# Altium PCB iMX6 Rex_V1I1_PCB.PcbDoc (part 7 of 8)
Units mm, origin at the board's own origin, x right, y up, seen from the top; angles counter-clockwise.
Board outline 70 x 40 mm, 12 copper layers (L1, L2, L3, L4, L5 (PWR), L6 (PWR), L7 (PWR), L8 (PWR), L9, L10, L11, L12), stack 1.566 mm thick; 473 components, 409 nets, 2294 pads, 1880 vias.
Unrouted connection lines stored in the file: 7.
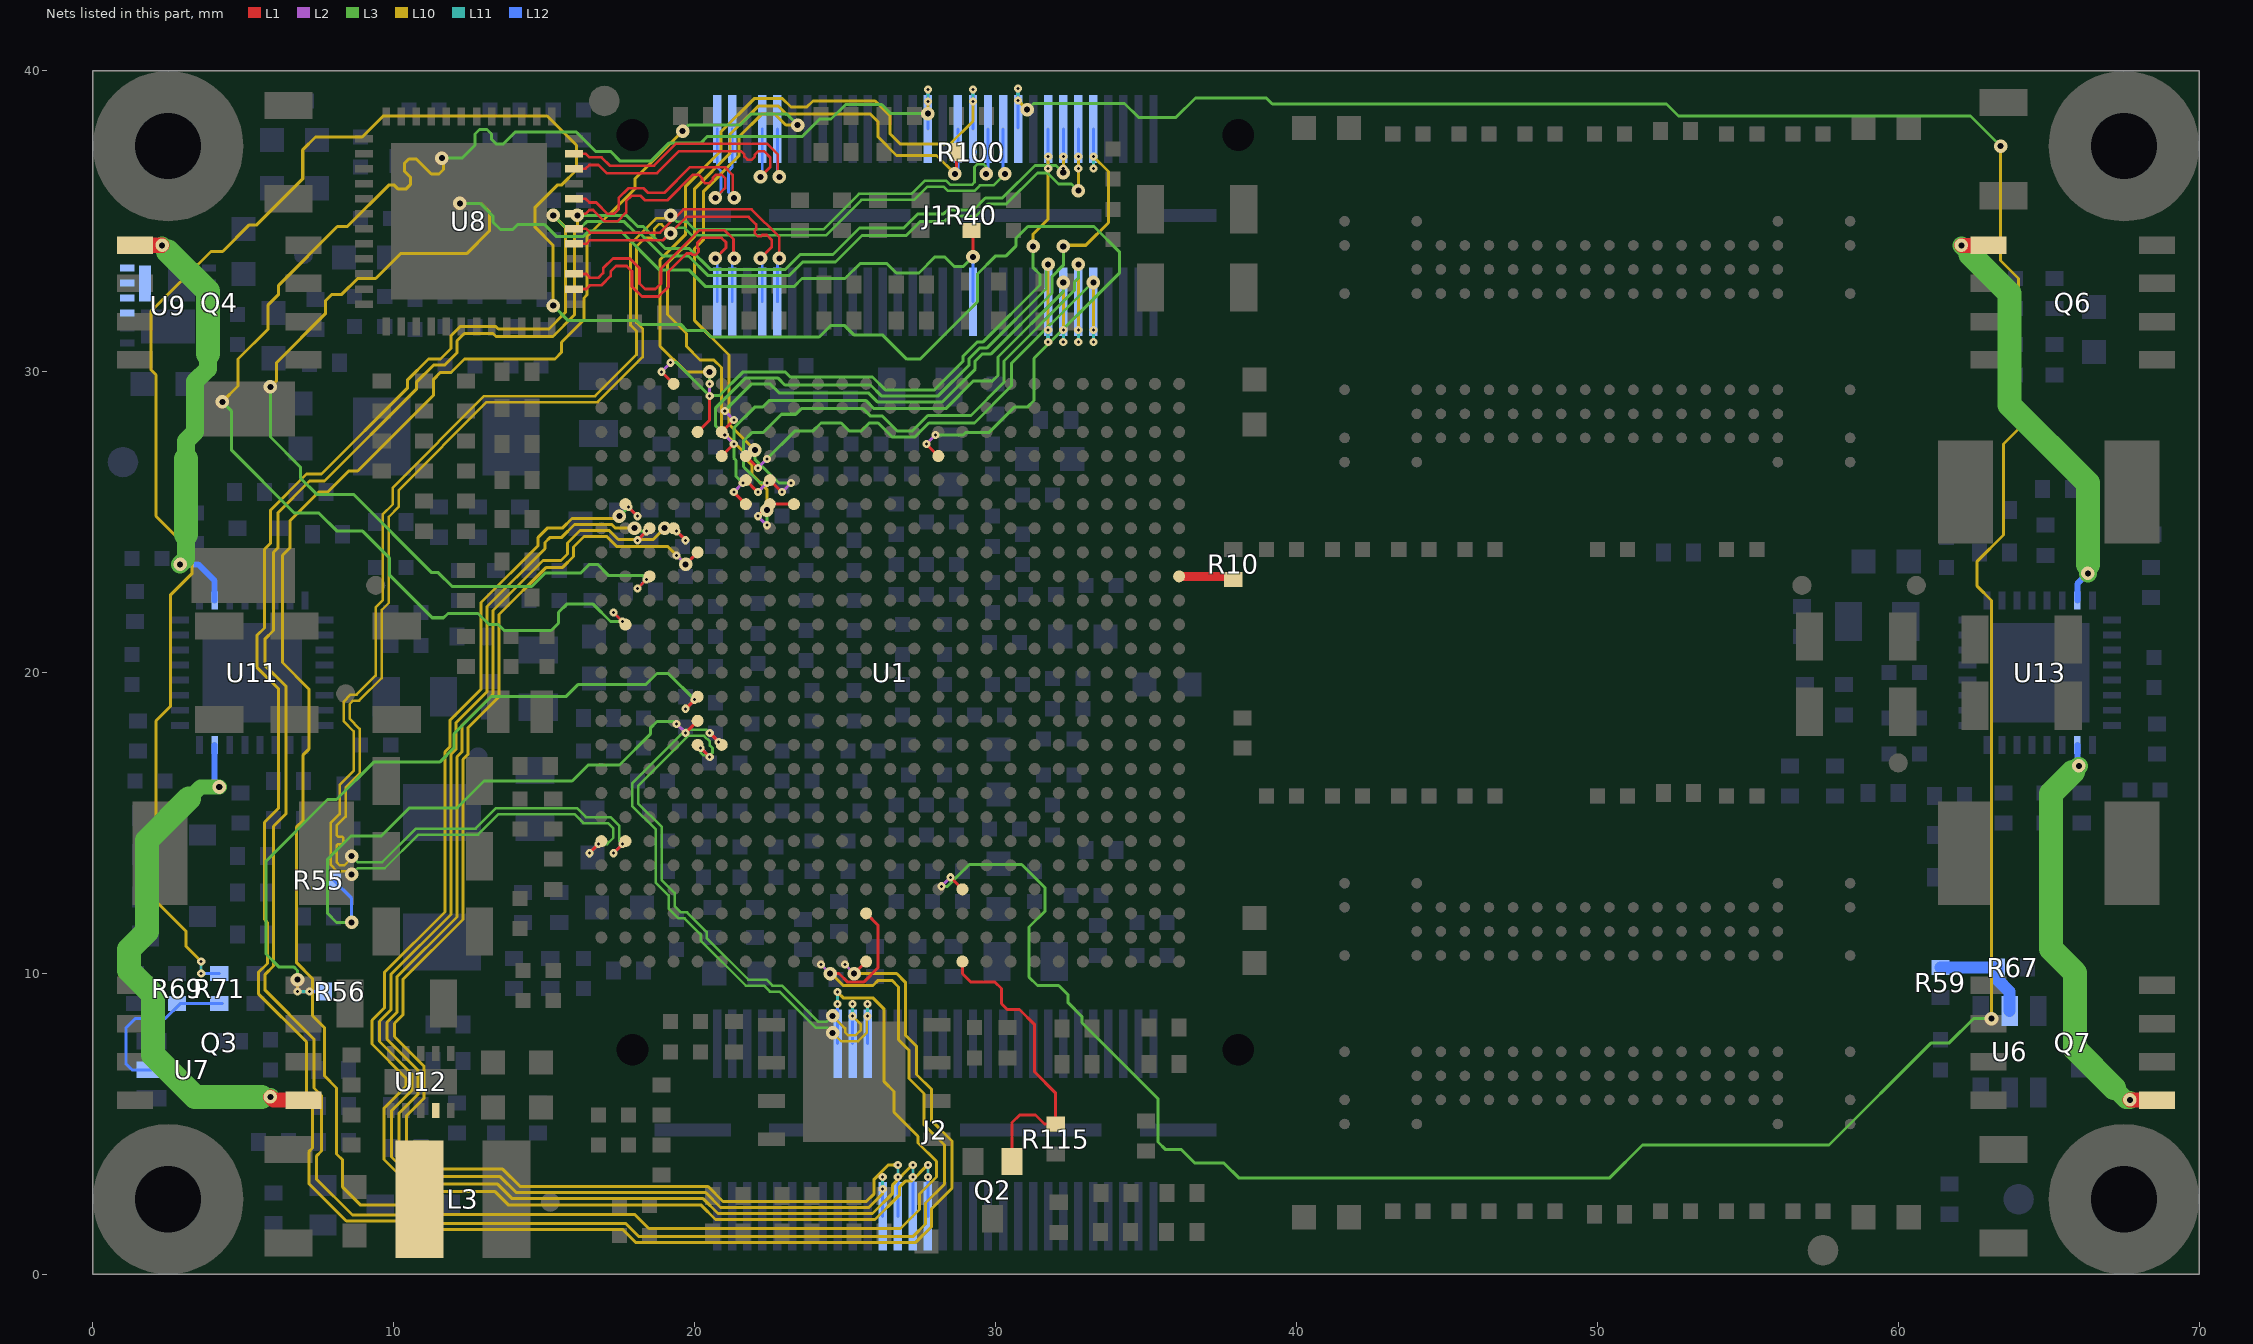
[diagram p17: the nets of this part, all layers, seen from the top]

## Via types
v1: diameter 0.45, hole 0.2, L1 to L12, tented both sides, 761 vias
v2: diameter 0.27, hole 0.1, L1 to L2, 305 vias
v3: diameter 0.27, hole 0.1, L2 to L3, 290 vias
v4: diameter 0.45, hole 0.2, L3 to L10, 196 vias
v5: diameter 0.27, hole 0.1, L11 to L12, 185 vias
v6: diameter 0.27, hole 0.1, L10 to L11, 142 vias
v7: diameter 0.45, hole 0.2, L3 to L10, tented both sides, 1 vias

## Nets (pads, with @x,y where several pads share a name; then routed paths per layer and width w, separated by ;. In a path a pad name is that pad's centre, name@x,y a point inside that pad or via, vN(x,y) a via of type N, cw(c..) or ccw(c..) an arc to the next point about the centre after c; other vN are vias at no path point) (continued)
SD3_DATA3: J1.32 U1.B15 | length 53.4
  L1 w0.1: v2(17.3,22) U1.B15@17.7,21.6
  L2 w0.1: v2(17.3,22) v3(17.6,21.7)
  L3 w0.1: v4(4.3,29) 4.6,28.7 4.6,27.404 6.704,25.3 7.517,25.3 8.117,24.7 8.969,24.7 9.85,23.819 9.85,23.25 11.275,21.825 11.655,21.825 11.8,21.97 12.8,21.97 13.17,21.6 13.47,21.6 13.67,21.4 15.23,21.4 15.475,21.645 15.475,22.005 15.745,22.275 16.628,22.275 17.203,21.7 v3(17.6,21.7) ; v4(11.6,37.1) 12.27,37.1 12.7,37.53 12.7,37.9 12.85,38.05 13.1,38.05 13.25,37.9 13.25,37.725 13.4,37.575 13.645,37.575 14.045,37.975 16.058,37.975 16.708,37.325 17.2,37.325 17.525,37 18.54,37 19.14,37.6 20.196,37.6 20.2,37.596 20.429,37.825 23.58,37.825 24.155,38.4 24.534,38.4 25.019,38.885 26.213,38.885 26.516,38.583 v4(27.75,38.583)
  L10 w0.1: v4(4.3,29) 4.825,29.525 4.825,30.425 5.825,31.425 5.825,32.225 6.175,32.575 6.175,32.875 8.125,34.825 8.455,34.825 9.83,36.2 10.02,36.2 10.15,36.07 10.4,36.07 10.55,36.22 10.55,36.47 10.35,36.67 10.35,36.92 10.5,37.07 10.75,37.07 11.25,36.57 11.5,36.57 11.65,36.72 11.65,37.05 v4(11.6,37.1) ; v4(27.75,38.583) v6(27.75,38.982)
  L11 w0.1: v6(27.75,38.982) v5(27.75,39.383)
  L12 w0.1: J1.32@27.75,38.07 v5(27.75,39.383)
SD3_WP: J1.25 R40.1 U1.C17 | length 51.6
  L1 w0.1: v2(18.1,22.8) U1.C17@18.5,23.2 ; R40.1@29.2,34.7 29.25,34.65 v1(29.25,33.82)
  L2 w0.1: v2(18.1,22.8) v3(18.4,23.1)
  L3 w0.1: v4(5.9,29.5) 5.9,27.83 6.9,26.83 6.9,26.465 7.44,25.925 8.662,25.925 11.262,23.325 11.48,23.325 11.94,22.865 14.583,22.865 15.033,23.315 16.218,23.315 16.503,23.6 16.77,23.6 17.145,23.225 18.275,23.225 v3(18.4,23.1) ; v4(12.2,35.6) 12.87,35.6 13.3,35.17 13.3,34.97 13.545,34.725 13.955,34.725 14.13,34.9 15,34.9 15.4,34.5 16.304,34.5 16.479,34.675 17.544,34.675 18.844,33.375 19.821,33.375 20.366,32.83 23.3,32.83 23.57,33.1 25,33.1 25.5,33.6 26.385,33.6 26.7,33.285 27.455,33.285 27.99,33.82 28.303,33.82 28.623,33.5 28.93,33.5 v1(29.25,33.82)
  L10 w0.1: v4(5.9,29.5) 6.1,29.7 6.1,30.3 7.725,31.925 7.725,32.355 7.945,32.575 8.275,32.575 8.8,33.1 9.4,33.1 10.225,33.925 12.425,33.925 13.175,34.675 13.175,35.325 12.9,35.6 v4(12.2,35.6)
  L12 w0.1: J1.25@29.25,32.33 v1(29.25,33.82)
SENSE_1V5: R59.1 R67.2 U6.5 | length 3.5
  L12 w0.4: R59.1@61.4,10.2 62.4,10.2 R67.2@63.3,10.2 63.3,9.8 63.7,9.4 U6.5@63.7,8.75
SW_3V0_SNVS: L3.1 U12.9
SW_EP: U9.3 U9.4 U9.5 U9.6 U9.14
TAMPER: R55.1 U1.E11 | length 19
  L1 w0.1: v2(19.7,18) U1.E11@20.1,18.4
  L2 w0.1: v3(19.4,18.3) v2(19.7,18)
  L3 w0.1: v1(8.6,11.7) 8.1,11.7 7.8,12 7.8,13.8 8.575,14.575 9.588,14.575 10.513,15.5 12.1,15.5 13,16.4 15.93,16.4 16.462,16.931 17.5,16.931 18.525,17.956 18.525,18.155 18.745,18.375 19.325,18.375 v3(19.4,18.3)
  L12 w0.1: R55.1@8,13.1 8.6,12.5 v1(8.6,11.7)
TEST_MODE: R56.2 U1.E12 | length 24.4
  L1 w0.1: v2(19.7,18.8) U1.E12@20.1,19.2
  L2 w0.1: v2(19.7,18.8) v3(20,19.1)
  L3 w0.1: v4(6.8,9.8) 6.8,10.1 6.675,10.225 6.175,10.225 5.75,10.65 5.75,13.737 7.8,15.787 8.1,15.787 9.338,17.025 11.525,17.025 12,17.5 12,17.966 13.234,19.2 15.717,19.2 16.117,19.6 18.37,19.6 18.745,19.975 19.125,19.975 v3(20,19.1)
  L10 w0.1: v6(6.8,9.4) v4(6.8,9.8)
  L11 w0.1: v6(6.8,9.4) v5(7.2,9.4)
  L12 w0.1: v5(7.2,9.4) R56.2@7.7,9.4
TRD0_N: J1.57 U8.3 | length 9.8
  L1 w0.09: U8.3@15.99,33.25 16.4,33.25 16.525,33.125 16.8,33.125 16.96,33.285 16.96,33.441 17.286,33.767 17.844,33.767 18.17,33.441 18.17,32.937 ; 18.17,32.93 18.35,32.75 18.7,32.75 18.88,32.93 18.88,33.434 20.146,34.7 21,34.7 21.292,34.408 21.292,33.787 v1(21.312,33.767)
  L12 w0.09: J1.57@21.25,32.33 21.25,33.705 v1(21.312,33.767)
TRD0_P: J1.59 U8.2 | length 9.8
  L1 w0.09: U8.2@15.99,32.75 16.4,32.75 16.525,32.875 16.904,32.875 17.21,33.181 17.21,33.337 17.39,33.517 17.74,33.517 17.92,33.337 17.92,32.826 18.246,32.5 18.804,32.5 19.13,32.826 19.13,33.33 19.73,33.93 19.887,33.93 19.93,33.887 20.03,33.887 20.13,33.987 20.13,34.087 20.087,34.13 20.087,34.287 20.25,34.45 20.896,34.45 21.043,34.304 21.043,34.122 v1(20.687,33.767)
  L12 w0.09: v1(20.687,33.767) 20.75,33.705 J1.59@20.75,32.33
TRD1_N: J1.51 U8.6 | length 9.8
  L1 w0.09: U8.6@15.99,34.75 16.4,34.75 16.525,34.625 18.852,34.625 19.627,35.4 21.896,35.4 22.813,34.484 v1(22.813,33.767)
  L12 w0.09: J1.51@22.75,32.33 22.75,33.705 v1(22.813,33.767)
TRD1_P: J1.53 U8.5 | length 9.8
  L1 w0.09: U8.5@15.99,34.25 16.4,34.25 16.525,34.375 18.955,34.375 19.73,35.15 21.793,35.15 22.043,34.9 22.043,34.743 22,34.7 22,34.6 22.1,34.5 22.2,34.5 22.243,34.543 22.4,34.543 22.563,34.38 22.563,34.142 v1(22.188,33.767)
  L12 w0.09: v1(22.188,33.767) 22.25,33.705 J1.53@22.25,32.33
TRD2_N: J1.58 U8.8 | length 9.8
  L1 w0.09: U8.8@15.99,35.75 16.375,35.75 16.5,35.625 16.729,35.625 17.104,35.25 17.325,35.25 17.475,35.4 17.475,35.775 17.8,36.1 18.304,36.1 18.454,35.95 18.996,35.95 19.846,36.8 21,36.8 21.263,36.538 21.263,35.83 v1(21.312,35.78)
  L12 w0.09: J1.58@21.25,38.07 21.25,36.8 21.125,36.675 21.125,35.967 v1(21.312,35.78)
TRD2_P: J1.60 U8.7 | length 9.8
  L1 w0.09: U8.7@15.99,35.25 16.375,35.25 16.5,35.375 16.625,35.375 17,35 17.429,35 17.725,35.296 17.725,35.671 17.904,35.85 18.2,35.85 18.35,35.7 19.1,35.7 19.95,36.55 20.131,36.55 20.246,36.435 20.246,36.37 20.346,36.27 20.496,36.27 20.596,36.37 20.596,36.435 20.711,36.55 20.896,36.55 21.013,36.434 21.013,36.105 v1(20.688,35.78)
  L12 w0.09: v1(20.688,35.78) 20.875,35.968 20.875,36.675 20.75,36.8 J1.60@20.75,38.07
TRD3_N: J1.52 U8.11 | length 9.8
  L1 w0.09: U8.11@15.99,37.25 16.375,37.25 16.5,37.125 16.904,37.125 17.179,36.85 18.65,36.85 19.38,37.58 22.404,37.58 22.762,37.221 22.762,36.53 v1(22.812,36.48)
  L12 w0.09: J1.52@22.75,38.07 22.75,36.542 v1(22.812,36.48)
TRD3_P: J1.54 U8.10 | length 9.8
  L1 w0.09: U8.10@15.99,36.75 16.375,36.75 16.5,36.875 16.8,36.875 17.075,36.6 18.754,36.6 19.484,37.33 21.535,37.33 21.65,37.215 21.65,37.15 21.75,37.05 21.9,37.05 22,37.15 22,37.215 22.115,37.33 22.3,37.33 22.512,37.118 22.512,36.805 v1(22.188,36.48)
  L12 w0.09: v1(22.188,36.48) 22.25,36.543 J1.54@22.25,38.07
UART1_CTS: J1.11 U1.G21 | length 21.8
  L1 w0.1: U1.G21@21.7,26.4 v2(22.1,26)
  L2 w0.1: v2(22.1,26) v3(22.4,26.3)
  L3 w0.1: v3(22.4,26.3) 22.17,26.3 21.625,26.845 21.625,27.7 21.9,27.975 22.272,27.975 22.885,28.588 23.358,28.588 23.545,28.775 25.6,28.775 25.85,28.525 26.245,28.525 26.745,28.025 27.225,28.025 27.75,28.55 29.18,28.55 30.278,29.648 30.278,30.358 32.625,32.705 32.625,32.988 32.75,33.113 v4(32.75,33.568)
  L10 w0.1: v6(32.75,31.39) v4(32.75,33.568)
  L11 w0.1: v5(32.75,30.99) v6(32.75,31.39)
  L12 w0.1: v5(32.75,30.99) J1.11@32.75,32.303
UART1_DCD: J1.16 U1.D25 | length 22.1
  L1 w0.1: v2(18.9,30) U1.D25@19.3,29.6
  L2 w0.1: v2(18.9,30) v3(19.2,30.3)
  L3 w0.1: v3(19.2,30.3) 19.397,30.3 20.482,29.215 20.829,29.215 21.614,30 23,30 23.175,29.825 25.911,29.825 26.336,29.4 27.967,29.4 28.925,30.358 28.925,30.521 29.386,30.983 29.571,30.983 31.475,32.886 31.475,33.23 31.25,33.455 v4(31.25,34.168)
  L10 w0.1: v4@31.25,34.205 31.25,34.58 31.75,35.08 v6(31.75,37.158)
  L11 w0.1: v5(31.75,36.758) v6(31.75,37.158)
  L12 w0.1: v5(31.75,36.758) J1.16@31.75,38.07
UART1_DSR: J1.9 U1.G22 | length 18.6
  L1 w0.1: U1.G22@21.7,27.2 v2(22.1,26.8)
  L2 w0.1: v2(22.1,26.8) v3(22.4,27.1)
  L3 w0.1: v3(22.4,27.1) 23.325,28.025 23.925,28.025 24.2,28.3 24.87,28.3 25.145,28.025 25.525,28.025 25.8,28.3 26.1,28.3 26.375,28.025 26.575,27.825 27.308,27.825 27.783,28.3 29.3,28.3 30.525,29.525 30.525,30.272 33.22,32.968 v7(33.25,32.968)
  L10 w0.1: v6(33.25,31.39) v7(33.25,32.968)
  L11 w0.1: v5(33.25,30.99) v6(33.25,31.39)
  L12 w0.1: v5(33.25,30.99) J1.9@33.25,32.303
UART1_DTR: J1.15 U1.F22 | length 19.9
  L1 w0.1: U1.F22@20.9,27.2 v2(21.3,27.6)
  L2 w0.1: v3(21,27.9) v2(21.3,27.6)
  L3 w0.1: v3(21,27.9) 20.7,28.2 20.7,28.803 21.697,29.8 22.759,29.8 22.996,29.562 25.841,29.562 26.203,29.2 28.1,29.2 29.125,30.225 29.125,30.438 29.469,30.783 29.704,30.783 31.675,32.754 ; 31.675,32.804 31.675,33.493 v4(31.75,33.568)
  L10 w0.1: v6(31.75,31.39) v4(31.75,33.568)
  L11 w0.1: v5(31.75,30.99) v6(31.75,31.39)
  L12 w0.1: v5(31.75,30.99) J1.15@31.75,32.303
UART1_RI: J1.10 U1.F23 | length 21.8
  L1 w0.1: U1.F23@20.9,28 v2(21.3,28.4)
  L2 w0.1: v3(21,28.7) v2(21.3,28.4)
  L3 w0.1: v3(21,28.7) 21.9,29.6 22.5,29.6 22.8,29.3 25.77,29.3 26.07,29 28.237,29 29.325,30.088 29.325,30.355 29.552,30.583 29.837,30.583 31.875,32.621 31.875,33.162 32.25,33.537 v4(32.25,34.168)
  L10 w0.1: v4(32.25,34.168) 32.288,34.205 33,34.205 33.75,34.955 33.75,36.657 v6(33.25,37.158)
  L11 w0.1: v5(33.25,36.758) v6(33.25,37.158)
  L12 w0.1: v5(33.25,36.758) J1.10@33.25,38.07
UART1_RTS: J1.13 U1.G20 | length 19.9
  L1 w0.1: v2(21.3,26) U1.G20@21.7,25.6
  L2 w0.1: v2(21.3,26) v3(21.6,26.3)
  L3 w0.1: v3(21.6,26.3) 21.375,26.525 21.375,27.055 21.3,27.13 21.3,28.13 21.995,28.825 22.255,28.825 22.468,29.037 25.7,29.037 25.962,28.775 28.345,28.775 29.27,29.7 29.9,29.7 30.078,29.878 30.078,30.491 32.25,32.663 v4(32.25,32.968)
  L10 w0.1: v6(32.25,31.39) v4(32.25,32.968)
  L11 w0.1: v5@32.25,30.99 v6(32.25,31.39)
  L12 w0.1: v5@32.25,30.99 J1.13@32.25,32.303
  other v5: 32.25,30.99
UART1_RXD: J1.14 U1.M3 | length 98.1
  L1 w0.1: v2(24.5,10) 24.8,10 25.085,9.715 25.615,9.715 26.1,10.2 26.1,11.6 U1.M3@25.7,12
  L2 w0.1: v3(24.2,10.3) v2(24.5,10)
  L3 w0.1: v4(16.1,35.2) 17.73,35.2 18.105,34.825 18.295,34.825 19.02,34.1 19.825,34.1 20.532,33.392 23,33.392 23.508,33.9 24.6,33.9 25.48,34.78 26.95,34.78 27.42,35.25 28.275,35.25 28.405,35.38 29.267,35.38 29.662,35.775 30.225,35.775 31.308,36.858 32.01,36.858 v4(32.25,36.618) ; v3(24.2,10.3) v2(24.5,10)
  L10 w0.1: v4(16.1,35.2) 16.1,34.8 16,34.7 16,31.887 15.288,31.175 13.4,31.175 13.3,31.275 12.345,31.275 12.1,31.03 12.1,30.63 11.695,30.225 11.325,30.225 10.75,29.65 10.75,29.417 7.7,26.367 7.2,26.367 6.15,25.317 6.15,24.15 6,24 6,21.4 5.713,21.113 5.713,20.251 6.425,19.538 6.425,15.317 6,14.892 6,10.25 5.725,9.975 5.725,9.445 7.35,7.82 7.35,6.2 7.6,5.95 7.6,4.1 7.425,3.925 7.425,3.175 8.625,1.975 10.861,1.975 11.136,1.7 17.7,1.7 18.132,1.268 27.268,1.268 27.675,1.675 27.675,2.375 28.3,3 28.3,4.3 27.625,4.975 27.625,6.011 27.125,6.511 27.125,7.453 26.775,7.803 26.775,9.555 26.555,9.775 26.1,9.775 25.925,9.6 24.936,9.6 24.536,10 v2(24.5,10) ; v4(32.25,36.618) v6(32.25,37.158)
  L11 w0.1: v5@32.25,36.758 v6(32.25,37.158)
  L12 w0.1: v5@32.25,36.758 J1.14@32.25,38.07
  other v4: 24.5,10
  other v5: 32.25,36.758
UART1_TXD: J1.12 U1.M1 | length 97.4
  L1 w0.1: v4(25.3,10) U1.M1@25.7,10.4
  L2 w0.1: v3(25,10.3) v4(25.3,10)
  L3 w0.1: v4(15.3,35.2) 15.675,34.825 16.255,34.825 16.43,35 17.647,35 18.022,34.625 18.162,34.625 18.937,33.85 19.792,33.85 20.449,33.192 23.133,33.192 23.59,33.65 24.683,33.65 25.563,34.53 27.033,34.53 27.503,35 28.308,35 28.488,35.18 29.35,35.18 29.745,35.575 30.358,35.575 31.39,36.608 31.73,36.608 32.095,36.243 32.525,36.243 v4(32.75,36.018) ; v3(25,10.3) v4(25.3,10)
  L10 w0.1: v4(15.3,35.2) 15.7,34.8 15.7,31.97 15.155,31.425 13.475,31.425 13.4,31.5 12.2,31.5 11.9,31.2 11.9,30.77 11.555,30.425 11.155,30.425 10.45,29.72 10.45,29.45 7.6,26.6 7.1,26.6 5.9,25.4 5.9,24.3 5.7,24.1 5.7,21.483 5.45,21.233 5.45,20.18 6.175,19.455 6.175,15.5 5.7,15.025 5.7,11.8 5.8,11.7 5.8,10.333 5.5,10.033 5.5,9.33 7.1,7.73 7.1,6 7.3,5.8 7.3,4.2 7.175,4.075 7.175,3.025 8.425,1.775 10.778,1.775 11.053,1.5 17.6,1.5 18.032,1.068 27.35,1.068 27.875,1.592 27.875,2.192 28.55,2.867 28.55,4.433 27.875,5.108 27.875,6.144 27.375,6.644 27.375,7.586 27,7.961 27,9.713 26.713,10 v4(25.3,10) ; v4(32.75,36.018) v6(32.75,37.158)
  L11 w0.1: v5(32.75,36.758) v6(32.75,37.158)
  L12 w0.1: v5(32.75,36.758) J1.12@32.75,38.07
  other v2: 25.3,10
UART2_CTS: J2.31 U1.B20 | length 49.7
  L1 w0.1: U1.B20@17.7,25.6 v2(18.1,25.2)
  L2 w0.1: v3(17.8,25.5) v2(18.1,25.2)
  L3 w0.1: v4(17.5,25.2) v3(17.8,25.5)
  L10 w0.1: v4(17.5,25.2) 17.425,25.125 15.925,25.125 15.6,24.8 15.1,24.8 14.8,24.5 14.8,24.229 12.9,22.329 12.9,19.449 11.875,18.424 11.875,17.545 11.7,17.37 11.7,12.049 9.7,10.049 9.7,8.87 9.275,8.445 9.275,7.655 10.4,6.53 10.4,6.249 9.675,5.524 9.675,3.821 10.746,2.75 13.371,2.75 13.821,2.3 20.219,2.3 20.694,1.825 25.994,1.825 26.8,2.631 26.8,2.9 27,3.1 27.207,3.1 v6(27.75,3.643)
  L11 w0.1: v5(27.75,3.243) v6(27.75,3.643)
  L12 w0.1: J2.31@27.75,1.93 v5(27.75,3.243)
UART2_RTS: J2.33 U1.C19 | length 48.8
  L1 w0.1: v2(18.1,24.4) U1.C19@18.5,24.8
  L2 w0.1: v2(18.1,24.4) v3(18.4,24.7)
  L3 w0.1: v4(18,24.8) 18.1,24.7 v3(18.4,24.7)
  L10 w0.1: v4(18,24.8) 17.37,24.8 17.245,24.925 16.008,24.925 15.583,24.5 15.2,24.5 15.025,24.325 15.025,24.121 13.1,22.196 13.1,19.366 12.075,18.341 12.075,17.462 11.9,17.287 11.9,11.966 9.9,9.966 9.9,8.787 9.525,8.412 9.525,7.738 10.6,6.663 10.6,6.116 9.925,5.441 9.925,3.904 10.829,3 13.454,3 13.934,2.52 20.282,2.52 20.777,2.025 25.911,2.025 26.58,2.695 26.58,2.98 27.243,3.643 v6(27.25,3.643)
  L11 w0.1: v5(27.25,3.243) v6(27.25,3.643)
  L12 w0.1: J2.33@27.25,1.93 v5(27.25,3.243)
UART2_RXD: J2.35 U1.E18 | length 49
  L1 w0.1: v4(19.7,23.6) U1.E18@20.1,24
  L2 w0.1: v3(19.4,23.9) v4(19.7,23.6)
  L3 w0.1: v3(19.4,23.9) v4(19.7,23.6)
  L10 w0.1: 10.425,5 10.425,5.275 ; v4(19.7,23.6) 19.1,24.2 17.404,24.2 17.079,24.525 16.324,24.525 15.975,24.176 15.975,23.862 15.613,23.5 15.07,23.5 13.5,21.93 13.5,19.2 12.475,18.175 12.475,17.296 12.3,17.121 12.3,11.8 10.3,9.8 10.3,8.621 10.025,8.346 10.025,7.904 11,6.929 11,5.85 10.425,5.275 ; v6(26.75,3.643) 26.443,3.643 25.965,3.165 25.965,2.685 25.705,2.425 20.943,2.425 20.448,2.92 14.2,2.92 13.62,3.5 10.995,3.5 10.425,4.07 10.425,5.275
  L11 w0.1: v5(26.75,3.243) v6(26.75,3.643)
  L12 w0.1: J2.35@26.75,1.93 v5(26.75,3.243)
  other v2: 19.7,23.6
UART2_TXD: J2.37 U1.D19 | length 47.8
  L1 w0.1: U1.D19@19.3,24.8 v2(19.7,24.4)
  L2 w0.1: v3(19.4,24.7) v2(19.7,24.4)
  L3 w0.1: v4(19,24.8) 19.1,24.7 v3(19.4,24.7)
  L10 w0.1: v4(19,24.8) 18.625,24.425 17.462,24.425 17.162,24.725 16.191,24.725 15.775,24.309 15.775,23.945 15.555,23.725 14.962,23.725 13.3,22.063 13.3,19.283 12.275,18.258 12.275,17.379 12.1,17.204 12.1,11.883 10.1,9.883 10.1,8.704 9.775,8.379 9.775,7.821 10.8,6.796 10.8,5.983 10.175,5.358 10.175,3.987 10.912,3.25 13.537,3.25 14.067,2.72 20.365,2.72 20.86,2.225 25.788,2.225 26.25,2.687 v6(26.25,2.842)
  L11 w0.1: v6(26.25,2.842) v5(26.25,3.243)
  L12 w0.1: J2.37@26.25,1.93 v5(26.25,3.243)
UGATE1_2V5: Q6.1 U13.15 | length 14.6
  L1 w0.5: v1(62.1,34.2) 62.995,34.2 Q6.1@63,34.205
  L3 w0.6: v1(62.1,34.2) 62.4,33.9 ; v1(66.3,23.3) 66.3,23.6
  L3 w0.8: 62.4,33.9 63.7,32.6 63.7,28.9 66.3,26.3 66.3,23.6
  L12 w0.2: U13.15@65.95,22.4 65.95,22.95 v1(66.3,23.3)
UGATE1_3V3: Q3.1 U11.15 | length 17.9
  L1 w0.5: v1(5.9,5.9) 6.005,5.795 Q3.1@7,5.795
  L3 w0.5: 3.2,15.825 3.575,16.2 v1(4.2,16.2)
  L3 w0.6: 5.6,5.9 v1(5.9,5.9)
  L3 w0.8: 3.2,15.825 1.8,14.425 1.8,11.4 1.2,10.8 1.2,10.1 2,9.3 2,7.3 3.4,5.9 5.6,5.9
  L12 w0.2: U11.15@4.05,17.6 4.05,16.35 v1(4.2,16.2)
UGATE2_1V5: Q7.1 U13.26 | length 14.3
  L1 w0.5: v1(67.7,5.8) 68.595,5.8 Q7.1@68.6,5.795
  L3 w0.6: 65.8,16.7 v1(66,16.9) ; 67.175,6.2 67.575,5.8 v1(67.7,5.8)
  L3 w0.8: 65.8,16.7 65.075,15.975 65.075,10.825 65.875,10.025 65.875,7.5 67.175,6.2
  L12 w0.2: U13.26@65.95,17.6 65.95,16.95 v1(66,16.9)
UGATE2_1V375: Q4.1 U11.26 | length 14.5
  L1 w0.5: Q4.1@1.4,34.205 v1@2.295,34.205
  L3 w0.6: v1(2.3,34.2) 2.5,34 ; v1(2.9,23.6) 3.1,23.8 3.1,24.6 ; 3.1,27.1 3.1,27.7 3.4,28 3.4,29.675 3.825,30.1 3.825,30.6
  L3 w0.8: 2.5,34 3.825,32.675 3.825,30.6 ; 3.1,24.6 3.1,27.1
  L12 w0.2: v1(2.9,23.6) 3.5,23.6 4.05,23.05 U11.26@4.05,22.4
USB0_ID: J1.20 U1.T4 | length 112
  L1 w0.1: v2(28.5,13.2) U1.T4@28.9,12.8
  L2 w0.1: v3(28.2,12.9) v2(28.5,13.2)
  L3 w0.1: v3(28.2,12.9) 28.403,12.9 29.128,13.625 30.867,13.625 31.65,12.842 31.65,12.08 31.115,11.545 31.115,9.88 31.395,9.6 32.1,9.6 32.414,9.286 32.414,9.026 32.875,8.565 32.875,8.368 35.4,5.843 35.4,4.4 35.652,4.148 36.183,4.148 36.63,3.7 37.595,3.7 38.095,3.2 50.4,3.2 51.5,4.3 57.7,4.3 61.1,7.7 61.7,7.7 62.5,8.5 v4(63.1,8.5) ; v4(31.05,38.71) 31.257,38.918 34.288,38.918 34.75,38.455 36,38.455 36.645,39.1 39,39.1 39.2,38.9 52.3,38.9 52.7,38.5 62.4,38.5 v4(63.4,37.5)
  L10 w0.1: v6(30.75,39.01) v4(31.05,38.71) ; v4(63.1,8.5) 63.1,22.4 62.625,22.875 62.625,23.7 63.5,24.575 63.5,27.6 64,28.1 64,33.1 63.4,33.7 v4(63.4,37.5)
  L11 w0.1: v6(30.75,39.01) v5(30.75,39.41)
  L12 w0.1: J1.20@30.75,38.098 v5(30.75,39.41)
USB0_N: J1.22 U1.B6 | length 55.4
  L1 w0.101: v2(17.3,14) U1.B6@17.7,14.4
  L2 w0.1: v2(17.3,14) v3(17.6,14.3)
  L3 w0.085: v4(8.6,13.9) 8.8,13.7 9.617,13.7 10.737,14.82 12.717,14.82 13.397,15.5 16.083,15.5 16.383,15.2 17.2,15.2 17.5,14.9 17.5,14.4 v3(17.6,14.3) ; v4(19.2,34.6) 19.383,34.783 19.667,34.783 19.915,34.535 24.363,34.535 25.54,35.712 27.29,35.712 27.725,36.148 28.28,36.148 28.415,36.012 29.295,36.012 29.48,36.197 29.93,36.197 v1(30.312,36.58)
  L10 w0.085: v4(8.6,13.9) 8.6,13.841 8.359,13.6 8.2,13.6 8.1,13.7 8.1,14.25 8.15,14.3 8.275,14.3 8.325,14.35 8.325,14.5 8.275,14.55 8.15,14.55 8.1,14.6 8.1,14.917 8.4,15.217 8.4,16.187 8.868,16.654 8.868,18.135 8.532,18.47 8.532,18.95 8.65,19.068 8.85,19.068 9.6,19.817 9.6,22.084 9.833,22.317 9.833,25.18 10.168,25.515 10.168,26.068 13.089,28.989 16.772,28.989 18.268,30.485 18.268,31.432 18.068,31.632 18.068,34.165 18.351,34.449 18.599,34.449 18.653,34.503 18.653,34.75 18.803,34.9 18.9,34.9 v4(19.2,34.6)
  L12 w0.101: J1.22@30.25,38.07 30.25,36.642 v1(30.312,36.58)
USB0_P: J1.24 U1.A6 | length 55.4
  L1 w0.101: v2(16.5,14) U1.A6@16.9,14.4
  L2 w0.1: v2(16.5,14) v3(16.8,14.3)
  L3 w0.085: v4(8.6,13.3) 8.8,13.5 9.7,13.5 10.82,14.62 12.8,14.62 13.48,15.3 16,15.3 16.3,15 17.117,15 17.3,14.817 17.3,14.514 17.086,14.3 v3(16.8,14.3) ; v4(19.2,35.2) 19.417,34.983 19.75,34.983 19.998,34.735 24.28,34.735 25.457,35.912 27.207,35.912 27.643,36.348 28.363,36.348 28.498,36.212 29.212,36.212 29.3,36.3 29.3,36.8 29.4,36.9 29.6,36.9 29.688,36.812 v1(29.688,36.58)
  L10 w0.085: v4(8.6,13.3) 8.5,13.4 8.117,13.4 7.9,13.617 7.9,15 8.2,15.3 8.2,16.27 8.668,16.737 8.668,18.052 8.332,18.387 8.332,19.032 8.568,19.268 8.768,19.268 9.4,19.9 9.4,22.167 9.633,22.4 9.633,25.263 9.968,25.598 9.968,26.15 13.006,29.189 16.689,29.189 18.068,30.568 18.068,31.35 17.868,31.55 17.868,34.248 18.72,35.1 19.1,35.1 v4(19.2,35.2)
  L12 w0.101: v1(29.688,36.58) 29.75,36.642 J1.24@29.75,38.07
USB0_PWR_EN: J1.26 U1.E23 | length 24.8
  L1 w0.1: U1.E23@20.1,28 20.5,28.4 v2(20.5,29.2)
  L2 w0.1: v2(20.5,29.2) v3(20.5,29.6)
  L3 w0.1: v3(20.5,29.6) v4(20.5,30)
  L10 w0.1: v4(20.5,30) 19.7,30 18.85,30.85 18.85,33.72 19.7,34.57 19.7,36.166 20.87,37.335 20.87,37.966 21.979,39.075 22.921,39.075 23.199,38.797 23.728,38.797 23.93,39 26,39 26.5,38.5 26.5,37.9 26.832,37.568 28.488,37.568 29.25,38.33 v6(29.25,38.982)
  L11 w0.1: v6(29.25,38.982) v5(29.25,39.383)
  L12 w0.1: J1.26@29.25,38.07 v5(29.25,39.383)
USB1_N: J2.40 U1.F10 | length 20.4
  L1 w0.101: v2(20.5,18) U1.F10@20.9,17.6
  L2 w0.1: v2(20.5,18) v3(20.8,17.7)
  L3 w0.085: v3(20.8,17.7) 20.4,18.1 19.7,18.1 17.922,16.322 17.922,15.575 18.7,14.797 18.7,13.032 19.132,12.6 19.132,12.165 19.465,11.832 19.668,11.832 20.2,11.3 20.2,11.097 21.697,9.6 22.3,9.6 22.5,9.4 22.817,9.4 24.017,8.2 24.418,8.2 v4(24.588,8.03)
  L10 w0.085: v4(24.588,8.03) 24.868,7.75 25.433,7.75 25.725,8.042 25.725,8.557 v6(25.75,8.582)
  L11 w0.1: v6(25.75,8.582) v5(25.75,8.983)
  L12 w0.101: J2.40@25.75,7.67 v5(25.75,8.983)
USB1_P: J2.42 U1.E10 | length 20.3
  L1 w0.101: U1.E10@20.1,17.6 v2(20.5,17.2)
  L2 w0.1: v3(20.2,17.5) v2(20.5,17.2)
  L3 w0.085: v3(20.2,17.5) 20.2,17.35 20.3,17.25 20.5,17.25 20.593,17.343 20.593,17.493 20.508,17.579 20.508,17.71 20.317,17.9 19.783,17.9 18.122,16.24 18.122,15.658 18.9,14.88 18.9,13.115 19.332,12.683 19.332,12.248 19.548,12.032 19.75,12.032 20.4,11.383 20.4,11.18 21.78,9.8 22.383,9.8 22.583,9.6 22.9,9.6 24.1,8.4 24.395,8.4 v4(24.588,8.592)
  L10 w0.085: v4(24.588,8.592) 25,8.18 25,8.05 25.1,7.95 25.35,7.95 25.525,8.125 25.525,8.308 v6(25.25,8.583)
  L11 w0.1: v6(25.25,8.583) v5(25.25,8.983)
  L12 w0.101: J2.42@25.25,7.67 v5(25.25,8.983)
USB1_PWR_EN: J2.44 U1.H21 | length 96.5
  L1 w0.1: U1.H21@22.5,26.4 v2(22.9,26)
  L2 w0.1: v2(22.9,26) v3(23.2,26.3)
  L3 w0.1: v4(19.6,38) 19.808,38.208 21.523,38.208 21.89,38.575 23.05,38.575 v4(23.425,38.2) ; v4(22,27.4) 22,27.097 22.512,26.585 22.518,26.585 22.803,26.3 v3(23.2,26.3)
  L10 w0.1: v4(19.6,38) 18.025,36.425 18.025,36.095 16.425,34.495 16.425,32.555 16.325,32.455 16.325,31.729 15.575,30.979 15.575,30.645 15.355,30.425 12.35,30.425 11.9,29.975 11.545,29.975 11.325,29.755 11.325,29.225 8.8,26.7 8.5,26.7 7.8,26 7.5,26 6.55,25.05 6.55,24.15 6.3,23.9 6.3,20.334 7.175,19.459 7.175,17.458 6.987,17.27 6.987,15.088 6.775,14.875 6.775,10.355 7.3,9.83 7.3,8.6 7.7,8.2 7.7,6.6 8.1,6.2 8.1,4 8.3,3.8 8.3,2.9 8.9,2.3 10.819,2.3 11.119,2 18,2 18.475,1.525 26.838,1.525 27.475,2.162 27.475,2.675 28.035,3.235 28.035,3.761 27.425,4.371 27.425,4.592 26.625,5.392 26.625,6.081 26.3,6.406 26.3,8.818 25.938,9.18 24.953,9.18 v6(24.75,9.383) ; v4(22,27.4) 21.141,28.259 21.141,30.559 20,31.7 20,34.1 20.3,34.4 20.3,36 21.47,37.17 21.47,37.8 22.245,38.575 22.655,38.575 23.03,38.2 v4(23.425,38.2)
  L11 w0.1: v5(24.75,8.983) v6(24.75,9.383)
  L12 w0.1: J2.44@24.75,7.67 v5(24.75,8.983)
USB_OC: J1.28 R100.1 U1.H20 U1.J20 | length 28.6
  L1 w0.1: v2(22.1,25.2) U1.H20@22.5,25.6 U1.J20@23.3,25.6 ; v1(28.65,36.58) 28.7,36.63 R100.1@28.7,37.3
  L2 w0.1: v2(22.1,25.2) v3(22.4,24.9)
  L3 w0.1: v3(22.4,24.9) v4(22.4,25.4)
  L10 w0.1: v4(22.4,25.4) 22.4,26.1 21.9,26.6 21.9,26.9 21.625,27.175 21.625,27.345 20.891,28.078 20.891,30.139 20.639,30.391 20.178,30.391 19.725,30.845 19.725,31.275 19.1,31.9 19.1,33.6 20,34.5 20,36.083 21.17,37.253 21.17,37.883 22.112,38.825 22.788,38.825 23.038,38.575 25.825,38.575 26.1,38.3 26.1,37.8 26.71,37.19 28.04,37.19 v1(28.65,36.58)
  L12 w0.1: v1(28.65,36.58) 28.75,36.68 J1.28@28.75,38.07
USER_LED: Q2.1 R115.1 U1.T1 | length 10.2
  L1 w0.1: U1.T1@28.9,10.4 28.9,9.997 29.182,9.715 29.985,9.715 30.2,9.5 30.2,9 30.4,8.8 30.405,8.805 30.795,8.805 31.3,8.3 31.3,6.725 32,6.025 R115.1@32,5 31.63,5 31.33,5.3 30.8,5.3 30.55,5.05 Q2.1@30.55,3.95
WD_OUT: R71.1 U1.R22 | length 81.9
  L1 w0.1: v2(27.7,27.6) U1.R22@28.1,27.2
  L2 w0.1: v2(27.7,27.6) v3(28,27.9)
  L3 w0.1: v4(15.3,32.2) 15.8,31.7 18.075,31.7 18.2,31.575 19.538,31.575 19.738,31.375 20.33,31.375 20.55,31.155 24.137,31.155 24.512,31.53 24.988,31.53 25.288,31.23 26.239,31.23 27.051,30.418 27.489,30.418 29.4,32.329 29.4,33.25 30.005,33.855 30.355,33.855 30.675,34.175 30.675,34.431 31.074,34.83 33.27,34.83 34.125,33.975 34.125,33.295 31.275,30.445 31.275,29.045 31.055,28.825 30.625,28.825 29.775,27.975 29,27.975 28.925,27.9 v3(28,27.9)
  L10 w0.1: v6(3.6,10.4) 3.1,10.9 3.1,11.4 2.1,12.4 2.1,18.4 2.575,18.875 2.575,22.575 3.3,23.3 3.3,24 2.1,25.2 2.1,29.9 1.925,30.075 1.925,32 3.925,34 4.313,34 5.198,34.885 5.448,34.885 6.975,36.412 6.975,37.375 7.4,37.8 8.95,37.8 9.65,38.5 15.1,38.5 16.075,37.525 16.075,36.705 15.585,36.215 15.445,36.215 14.7,35.47 14.7,34.8 15.3,34.2 v4(15.3,32.2)
  L11 w0.1: v5(3.6,10) v6(3.6,10.4)
  L12 w0.1: v5(3.6,10) R71.1@4.2,10
WD_OUT_R: R69.1 R71.2 U7.2 | length 5.7
  L12 w0.1: U7.2@1.95,6.8 1.3,6.8 1.1,7 1.1,8.2 1.4,8.5 2.4,8.5 2.9,9 R71.2@4.3,9
ZQPAD: R10.1 U1.AE17 | length 1.8
  L1 w0.3: U1.AE17@36.1,23.2 37.8,23.2 R10.1@37.9,23.1
pads on no net: FID1.1 FID2.1 FID3.1 FID4.1 J1.49 J1.65 J1.66 J2.65 J2.66 U1.A9 U1.A10 U1.A11 U1.A16 U1.A20 U1.A21 U1.AA1 U1.AA2 U1.AA3 U1.AA4 U1.AA11 U1.AB1 U1.AB2 U1.AB17 U1.AD17 U1.B8 U1.B9 U1.B10 U1.B11 U1.B16 U1.B17 U1.B19 U1.B21 U1.C5 U1.C8 U1.C13 U1.C15 U1.C16 U1.C20 U1.C25 U1.D1 U1.D2 U1.D4 U1.D5 U1.D13 U1.D15 U1.D18 U1.D20 U1.E1 U1.E2 U1.E3 U1.E4 U1.E13 U1.E16 U1.E19 U1.E22 U1.E24 U1.E25 U1.F1 U1.F2 U1.F3 U1.F4 U1.F13 U1.F15 U1.F17 U1.F24 U1.F25 U1.G1 U1.G2 U1.G4 U1.G23 U1.G25 U1.H1 U1.H2 U1.H3 U1.H4 U1.H22 U1.H23 U1.H24 U1.J19 U1.J21 U1.J22 U1.J23 U1.J24 U1.J25 U1.K20 U1.K21 U1.K22 U1.K23 U1.K24 U1.K25 U1.L1 U1.L3 U1.L4 U1.L6 U1.L20 U1.L21 U1.L22 U1.L23 U1.L24 U1.L25 U1.M2 U1.M4 U1.M5 U1.M6 U1.M20 U1.M21 U1.M22 U1.M23 U1.M24 U1.M25 U1.N2 U1.N19 U1.N20 U1.N21 U1.N22 U1.N23 U1.N24 U1.N25 U1.P1 U1.P4 U1.P5 U1.P6 U1.P20 U1.P21 U1.P25 U1.R1 U1.R2 U1.R3 U1.R4 U1.R5 U1.R6 U1.R7 U1.R20 U1.R21 U1.R23 U1.R24 U1.T2 U1.T6 U1.T20 U1.T22 U1.T23 U1.T24 U1.T25 U1.U6 U1.U7 U1.U20 U1.U22 U1.U25 U1.V5 U1.V6 U1.V24 U1.W5 U1.W6 U1.W20 U1.W21 U1.W23 U1.W24 U1.Y1 U1.Y2 U1.Y3 U1.Y4 U2.J1 U2.J9 U2.L1 U2.L9 U2.MECH01 U2.MECH02 U2.MECH03 U2.MECH04 U2.MECH05 U2.MECH06 U2.MECH07 U2.MECH08 U2.MECH09 U2.MECH10 U2.MECH11 U2.MECH12 U2.MECH13 U2.MECH14 U2.MECH15 U2.MECH16 U3.J1 U3.J9 U3.L1 U3.L9 U3.MECH01 U3.MECH02 U3.MECH03 U3.MECH04 U3.MECH05 U3.MECH06 U3.MECH07 U3.MECH08 U3.MECH09 U3.MECH10 U3.MECH11 U3.MECH12 U3.MECH13 U3.MECH14 U3.MECH15 U3.MECH16 U4.J1 U4.J9 U4.L1 U4.L9 U4.MECH01 U4.MECH02 U4.MECH03 U4.MECH04 U4.MECH05 U4.MECH06 U4.MECH07 U4.MECH08 U4.MECH09 U4.MECH10 U4.MECH11 U4.MECH12 U4.MECH13 U4.MECH14 U4.MECH15 U4.MECH16 U5.J1 U5.J9 U5.L1 U5.L9 U5.MECH01 U5.MECH02 U5.MECH03 U5.MECH04 U5.MECH05 U5.MECH06 U5.MECH07 U5.MECH08 U5.MECH09 U5.MECH10 U5.MECH11 U5.MECH12 U5.MECH13 U5.MECH14 U5.MECH15 U5.MECH16 U8.43 U11.9 U13.9

## Polygon pours and split planes (outlines as drawn)
GND on L12 "L12-GND" (solid, pour order 138): 5.1,38.5 5.4,38.2 5.4,37.3 6.4,37.3 6.4,39.4 5.2,39.4 5.1,39.3
+1V2_ETH on L12 "L12-+1V2_ETH" (solid, pour order 137): 27 vertices, not listed, extent 2.5,31.5 7.9,36.5
GND on L12 "L12-GND 1" (solid, pour order 197): 19.3,19.9 20,19.9 20,23.8 19.9,23.9 19.9,24.5 19.3,24.5 19.3,24.3 18.7,23.7 18.7,23.3 18.4,23 18.4,22.4 18.6,22.2 18.6,22 19.3,21.3
+3V3 on L12 "L12-+3V3" (solid, pour order 198): 18 vertices, not listed, extent 20.3,21.8 21.5,24.5
GND on L12 "L12-GND 2" (solid, pour order 134): 1.6,32.1 3.4,32.1 3.4,31.1 4.1,31.1 4.1,29.2 2.7,29.2 2.7,30 2.9,30 2.9,30.6 2.6,30.9 1.6,30.9
SW_EP on L12 "L12-SW_EP" (solid, pour order 135): 0.9,33.6 2,33.6 2,32.3 1.4,32.3 1.4,31.8 0.9,31.8 0.9,33.6
+3V3 on L12 "L12-+3V3 1" (solid, pour order 139): 0.9,31.1 1.4,31.1 1.4,30.5 1.8,30.1 1.9,30 2.1,30 2.1,29.1 1.6,28.6 1.2,28.6 1.1,28.7 1.1,28.8 1.1,30 0.9,30.2 0.9,31.1
GND on L12 "L12-GND 3" (solid, pour order 140): 18 vertices, not listed, extent 9.4,31.2 13,35.4
GND on L12 "L12-GND 4" (solid, pour order 141): 13.7,32.1 16.3,32.1 16.3,32.7 15.8,32.7 15.6,32.9 15.6,34.7 15,34.7 14.7,34.4 13.5,34.4 13.5,33.5 13.7,33.3
+1V2_ETH_AVDDL on L12 "L12-+1V2_ETH_AVDDL" (solid, pour order 142): 16,34.1 16.4,34.1 16.6,33.9 16.6,33.8 16.7,33.7 16.9,33.7 17,33.8 17,36.8 16.8,37 16,37 16,34.1
GND on L12 "L12-GND 5" (solid, pour order 143): 12.7,36.9 14.4,36.9 14.5,36.8 14.5,35.9 14.7,35.7 14.9,35.7 15,35.6 15,35.4 15.6,35.4 15.6,37.3 15.7,37.4 16.5,37.4 16.5,38 12.6,38 12.6,37
+VIN on L12 "L12-+VIN" (solid, pour order 150): 8.8,18.5 10.2,18.5 10.2,19.9 9.3,19.9 9.3,19.8 9,19.5 8.7,19.5 8.6,19.4 8.6,18.7
GND on L12 "L12-GND 6" (solid, pour order 151): 11.2,19.9 12.1,19.9 12.1,18.5 11.7,18.1 11.3,18.1 11.2,18.2
GND on L12 "L12-GND 7" (solid, pour order 152): 21 vertices, not listed, extent 13.7,19.4 17.1,23.7
GND on L12 "L12-GND 8" (solid, pour order 154): 7.7,11 8.2,11 8.2,10.7 8.8,10.1 9.4,10.1 9.5,10 9.5,8.8 9.4,8.7 8.5,8.7 8.4,8.8 8.4,9.8 7.9,10.3 7.8,10.3 7.7,10.4
+3V3 on L12 "L12-+3V3 2" (solid, pour order 155): 4.1,5.5 5.2,5.5 5.3,5.6 5.3,6.1 5.6,6.4 5.7,6.5 6.2,6.5 6.2,7.1 4.7,7.1 4.5,6.9 4.1,6.5 4.1,5.5
GND on L12 "L12-GND 9" (solid, pour order 199): 15.8,24.5 16.6,24.5 16.7,24.6 16.7,24.8 17,25.1 17.7,25.1 17.7,25.6 16.9,25.6 16.6,25.4 15.3,25.4 15.2,25.3 15.2,25.1 15.8,24.5
+1V375_VDDSOC_IN on L12 "L12-+1V375_VDDSOC_IN" (solid, pour order 201): 20.3,29.2 20.3,28.4 20.1,28.2 18,28.2 17.9,28.3 17.9,29.5 18,29.6 19,29.6 19.2,29.4 20.1,29.4
+1V375 on L12 "L12-+1V375" (solid, pour order 202): 18.9,30.2 18.9,31.1 18.7,31.3 16.8,31.3 16.7,31.2 16.7,30.7 16.8,30.6 17.7,30.6 18.1,30.2
GND on L12 "L12-GND 10" (solid, pour order 203): 23 vertices, not listed, extent 23.9,27.3 27.4,30.2
+VDDPU on L12 "L12-+VDDPU" (solid, pour order 206): 38 vertices, not listed, extent 22.7,23.4 26.9,25.5
+1V375_VDDSOC_IN on L12 "L12-+1V375_VDDSOC_IN 1" (solid, pour order 207): 28.1,25.9 28.1,26.7 28.8,26.7 29.1,27 29.4,27 29.5,26.9 29.5,26.6 29.4,26.5 29.4,26.1 29.2,25.9
+1V5_DDR on L12 "L12-+1V5_DDR" (solid, pour order 208): 31.5,27.5 31.5,26.7 31.2,26.4 31.2,25.7 31.1,25.6 30.7,25.6 30.6,25.7 30.1,25.7 29.7,26.1 29.7,26.9 30.3,26.9 30.6,27.2 30.6,27.5
GND on L12 "L12-GND 11" (solid, pour order 209): 35 vertices, not listed, extent 28.5,23.4 33.5,27.5
+1V5_DDR on L12 "L12-+1V5_DDR 1" (solid, pour order 210): 30 vertices, not listed, extent 29.1,21.8 33.3,24.6
GND on L12 "L12-GND 12" (solid, pour order 211): 20 vertices, not listed, extent 31.5,20.8 34.3,23.2
GND on L12 "L12-GND 13" (solid, pour order 205): 26.5,23.3 26.5,23.8 26.9,23.8 27.1,24 27.1,24.5 27.2,24.6 27.8,24.6 28,24.4 28,22.4 27.4,22.4 27.4,23.1 27.2,23.3
+1V5_DDR on L12 "L12-+1V5_DDR 2" (solid, pour order 216): 31.6,15.3 32.2,15.3 32.2,15.9 31.9,16.2 31.9,16.3 31.9,16.9 31.3,16.9 31.3,16.3 31.6,16 31.6,15.3
GND on L12 "L12-GND 14" (solid, pour order 213): 28 vertices, not listed, extent 21.8,21 25.6,22.7
+1V2_VDD_ARM_CAP on L12 "L12-+1V2_VDD_ARM_CAP" (solid, pour order 217): 60 vertices, not listed, extent 21.6,17.2 26.3,20.6
GND on L12 "L12-GND 15" (solid, pour order 218): 21 vertices, not listed, extent 18,17.8 22.2,18.8
GND on L12 "L12-GND 16" (solid, pour order 219): 13.5,14.7 13.7,14.7 14,14.4 15.4,14.4 15.4,15.3 15.3,15.4 14.2,15.4 13.8,15.8 13.8,16 13.7,16.1 13.5,16.1
GND on L12 "L12-GND 17" (solid, pour order 220): 31 vertices, not listed, extent 15.7,11.8 18.8,17.7
GND on L12 "L12-GND 18" (solid, pour order 221): 42 vertices, not listed, extent 23.6,15.1 27.9,19
+1V375 on L12 "L12-+1V375 1" (solid, pour order 222): 42 vertices, not listed, extent 24.8,13.2 30.5,17.7
GND on L12 "L12-GND 19" (solid, pour order 223): 23 vertices, not listed, extent 29.1,14.4 32.1,16.6
GND on L12 "L12-GND 20" (solid, pour order 224): 32.3,16.3 32.9,16.3 32.9,18.1 33.2,18.4 33.2,19.9 34.2,20.9 33.2,20.9 32.9,20.6 31.6,20.6 31.5,20.5 31.5,20.3 32.4,20.3 32.6,20.1 32.6,18.5 32.3,18.2
GND on L12 "L12-GND 21" (solid, pour order 225): 26.4,14.3 28.8,14.3 29.1,14 29.1,13.9 29.2,13.8 29.4,13.8 29.5,13.9 29.5,14.1 29.1,14.5 29.1,14.9 26.7,14.9 26.6,15 26.4,15
GND on L12 "L12-GND 22" (solid, pour order 226): 27 vertices, not listed, extent 18.8,11.5 20.6,14.2
GND on L12 "L12-GND 23" (solid, pour order 228): 17 vertices, not listed, extent 22.4,11.4 23.9,13.5
GND on L12 "L12-GND 24" (solid, pour order 229): 23.6,13.7 25.4,13.7 25.4,13.1 24.8,13.1 24.7,13 24.3,13 24.2,13.1 23.6,13.1 23.6,13.7
GND on L12 "L12-GND 25" (solid, pour order 230): 26 vertices, not listed, extent 27.6,9.3 33.1,12.7
GND on L12 "L12-GND 26" (solid, pour order 200): 30 vertices, not listed, extent 19.5,26.6 23.3,30.6
+1V375_VDDSOC_IN on L12 "L12-+1V375_VDDSOC_IN 2" (solid, pour order 212): 49 vertices, not listed, extent 21.7,21.8 27.9,23.7
+1V1_VDDSOC_CAP on L12 "L12-+1V1_VDDSOC_CAP" (solid, pour order 214): 23 vertices, not listed, extent 29.1,19.3 32.6,22.3
GND on L12 "L12-GND 27" (solid, pour order 231): 21 vertices, not listed, extent 26.6,21 29.5,22.2
+1V5_DDR on L12 "L12-+1V5_DDR 3" (solid, pour order 233): 63.6,33.4 66.1,33.4 66.9,32.6 66.9,31.7 66.1,31.7 66.1,32.5 65.8,32.8 63.6,32.8
GND on L12 "L12-GND 28" (solid, pour order 232): 63.6,29.6 66.5,29.6 66.9,30 66.9,31.1 66.1,31.1 66.1,30.3 66,30.2 63.6,30.2
+DDR_VREF on L12 "L12-+DDR_VREF" (solid, pour order 234): 17 vertices, not listed, extent 63.6,30.6 65.5,32.4
GND on L12 "L12-GND 29" (solid, pour order 235): 57.9,21 58.8,21 58.8,22.8 58.9,22.9 59.3,23.3 59.3,24.1 58.4,24.1 57.4,23.1 57.4,22.5 57.9,22
+1V5_DDR on L12 "L12-+1V5_DDR 4" (solid, pour order 215): 32.2,20.1 32.2,18.5 31.9,18.2 31.9,17.5 31.3,17.5 31.3,18.1 30.7,18.7 30.7,18.9 30.9,19.1 31.3,19.1 31.4,19.2 31.4,20.1
+3V0_ALWAYS on L12 "L12-+3V0_ALWAYS" (solid, pour order 136): 14.1,19.3 15.5,19.3 15.5,18.3 15,17.8 15,17.6 14.9,17.5 14.2,17.5 14.1,17.6
+3V3 on L12 "L12-+3V3 3" (solid, pour order 204): 23.9,26.9 26.5,26.9 26.5,26.3 26.2,26 25.8,26 25.5,26.3 25.1,26.3 24.7,25.9 24.3,25.9 23.9,26.3
+1V5_DDR on L1 "L1-+1V5_DDR" (solid, pour order 242): 63.4,12.2 63.4,15.1 64.3,16 64.3,17.1 63.4,18 63.4,19.4 63.1,19.7 59.7,19.7 59.7,16.8 61.3,15.2 61.3,12.2
+3V0_ALWAYS on L1 "L1-+3V0_ALWAYS" (solid, pour order 163): 18 vertices, not listed, extent 11.8,0.5 15.5,6
GND on L1 "L1-GND" (solid, pour order 169): 43 vertices, not listed, extent 16.7,11.8 21.1,16.2
+VIN on L1 "L1-+VIN" (solid, pour order 195): 17 vertices, not listed, extent 33.6,32 36.6,37.7
GND on L1 "L1-GND 1" (solid, pour order 190): 48 vertices, not listed, extent 21.9,15 31.5,17
GND on L1 "L1-GND 2" (solid, pour order 188): 30.9,19.3 31.2,19 31.4,19 31.5,19.1 31.5,19.3 31.4,19.4 31.4,19.8 31.9,20.3 31.9,20.5 31.8,20.6 31.6,20.6 30.9,19.9
GND on L1 "L1-GND 3" (solid, pour order 144): 7.3,39.3 7.3,38.4 5.3,38.4 5.1,38.6 5.1,39.2 5.3,39.4 7.3,39.4 7.3,39.3
+VIN on L1 "L1-+VIN 1" (solid, pour order 145): 7.6,33.9 7.6,34.7 7.3,35 7.3,36.3 7.6,36.6 7.6,37 7.5,37.1 5.7,37.1 5.6,37 5.6,34 5.7,33.9
GND on L1 "L1-GND 4" (solid, pour order 146): 0.8,33.3 0.8,31.3 3.2,31.3 3.3,31.4 3.3,33.2 3.2,33.3
PHASE2_1V375 on L1 "L1-PHASE2_1V375" (solid, pour order 147): 7,32.935 7,27.8 3.3,27.8 3.3,30 4.4,31.1 5.6,32.4 5.7,32.5 5.9,32.5 6.2,32.8 6.2,33.1 6.3,33.2 7,33.2
GND on L1 "L1-GND 5" (solid, pour order 149): 3.4,18 7.5,18 7.5,18.9 7.5,19.3 7.3,19.5 3.7,19.5 3.6,19.5 3.4,19.3 3.4,18
+3V3 on L1 "L1-+3V3" (solid, pour order 157): 6.8,12.3 8,11.1 8.7,11.1 8.9,10.9 9.2,10.6 10.2,10.6 10.2,17.2 9.7,17.2 9.6,17.3 8.7,18.2 8,18.2 7.7,17.9 7.7,17.7 6.8,16.8
GND on L1 "L1-GND 6" (solid, pour order 158): 9.3,18.9 11.5,18.9 11.7,18.7 11.7,17.8 11.7,17.7 11.5,17.5 10.3,17.5 10.2,17.5 9.9,17.8 9.7,18 9.3,18 9.3,18.9
GND on L1 "L1-GND 7" (solid, pour order 161): 5.1,0.6 7.9,0.6 7.9,1.3 7.7,1.5 5.3,1.5 5.1,1.3
SW_3V0_SNVS on L1 "L1-SW_3V0_SNVS" (solid, pour order 162): 11.5,5.7 11.5,4.9 11.7,4.7 11.7,0.5 10,0.5 10,4.5 10.9,4.5 11.3,4.9 11.3,5.7
GND on L1 "L1-GND 8" (solid, pour order 164): 12.9,7.6 15.3,7.6 15.3,6.6 12.9,6.6 12.9,7.6
GND on L1 "L1-GND 9" (solid, pour order 165): 6.4,6.8 7.6,6.8 7.6,8.7 7.5,8.8 7.3,8.8 7,9.1 6.6,9.1 6.4,8.9
GND on L1 "L1-GND 10" (solid, pour order 166): 8.3,7.1 8.9,7.1 8.9,8.1 9,8.2 9.5,8.7 9.5,9.9 9.4,10 9.3,10.1 8.1,10.1 8,10 8,8.2 8.3,7.9 8.3,7.1
+VIN on L1 "L1-+VIN 2" (solid, pour order 167): 11.5,7.1 10.8,7.1 10.8,9.5 11.1,9.8 12.7,9.8 13.1,9.4 13.1,8 13,7.9 12.6,7.9 12.4,8.1 11.9,8.1 11.5,7.7
GND on L1 "L1-GND 11" (solid, pour order 168): 13.6,17.2 13.7,17.1 13.7,14.7 13.6,14.6 13.5,14.6 13.3,14.4 13.3,13.3 13.5,13.1 13.6,13.1 13.7,13 13.7,11 13.3,10.6 12,10.6 12,17.2
+3V0_ALWAYS on L1 "L1-+3V0_ALWAYS 1" (solid, pour order 170): 23.4,16.6 23.5,16.7 23.5,16.9 23.4,17 22.6,17 22.4,17.2 22.3,17.3 22.2,17.4 22,17.4 21.9,17.3 21.9,17.1 22.4,16.6
+1V1_VDDSOC_CAP on L1 "L1-+1V1_VDDSOC_CAP" (solid, pour order 172): 28,17.4 28.8,17.4 29.1,17.1 29.5,17.1 29.9,17.5 29.9,17.7 29.8,17.8 29.6,17.8 29.4,17.6 29.2,17.6 29,17.8 28,17.8 27.9,17.7 27.9,17.5
+1V375 on L1 "L1-+1V375" (solid, pour order 171): 33 vertices, not listed, extent 23.9,16.3 29.9,17.3
+1V1_VDDSOC_CAP on L1 "L1-+1V1_VDDSOC_CAP 1" (solid, pour order 173): 28.8,19.8 29,19.8 29.2,20 29.4,20 29.6,19.8 29.8,19.8 29.9,19.9 29.9,20.9 29.5,21.3 29.1,21.3 28.8,21 28.7,20.9 28.7,19.9
+1V2_VDD_ARM_CAP on L1 "L1-+1V2_VDD_ARM_CAP" (solid, pour order 174): 48 vertices, not listed, extent 22.3,17.9 28.3,18.9
+1V2_VDD_ARM_CAP on L1 "L1-+1V2_VDD_ARM_CAP 1" (solid, pour order 175): 38 vertices, not listed, extent 22.3,19.5 28.3,20.5
+1V375 on L1 "L1-+1V375 1" (solid, pour order 176): 49 vertices, not listed, extent 22.3,20.3 28.3,21.3
GND on L1 "L1-GND 12" (solid, pour order 177): 20 vertices, not listed, extent 23.9,17.1 27.9,18.1
GND on L1 "L1-GND 13" (solid, pour order 178): 25 vertices, not listed, extent 22.3,19 25.9,19.7
GND on L1 "L1-GND 14" (solid, pour order 179): 18 vertices, not listed, extent 27.1,17.9 29.9,19.7
+3V3 on L1 "L1-+3V3 1" (solid, pour order 180): 19 vertices, not listed, extent 21.2,20.6 22,23.4
GND on L1 "L1-GND 15" (solid, pour order 181): 46 vertices, not listed, extent 22.3,21.1 29.9,22.1
+1V375_VDDSOC_IN on L1 "L1-+1V375_VDDSOC_IN" (solid, pour order 182): 52 vertices, not listed, extent 22.3,21.9 29.9,22.9
+VDDPU on L1 "L1-+VDDPU" (solid, pour order 183): 39 vertices, not listed, extent 22.3,23 27.5,23.7
GND on L1 "L1-GND 16" (solid, pour order 184): 52 vertices, not listed, extent 21.5,23 29.9,25
+3V3 on L1 "L1-+3V3 2" (solid, pour order 185): 31 vertices, not listed, extent 23.9,24.6 27.5,25.3
+1V5_DDR on L1 "L1-+1V5_DDR 1" (solid, pour order 186): 33 vertices, not listed, extent 27.9,16.6 31,24.5
GND on L1 "L1-GND 17" (solid, pour order 187): 32 vertices, not listed, extent 28.7,21.4 31.8,25.3
GND on L1 "L1-GND 18" (solid, pour order 189): 31.3,17.4 31.4,17.4 31.5,17.5 31.5,18.5 31.4,18.6 31.2,18.6 30.8,18.2 30.8,17.8 31.2,17.4 31.3,17.4
+2V5_VDDHIGH_VPH on L1 "L1-+2V5_VDDHIGH_VPH" (solid, pour order 191): 22.3,17.5 22.4,17.4 22.6,17.4 22.8,17.6 23,17.6 23.2,17.4 23.4,17.4 23.5,17.5 23.5,17.7 23.1,18.1 22.7,18.1 22.3,17.7
GND on L1 "L1-GND 19" (solid, pour order 192): 19 vertices, not listed, extent 22.6,35.1 24.5,37.6
GND on L1 "L1-GND 20" (solid, pour order 193): 17 vertices, not listed, extent 31.9,35 34.2,36.7
GND on L1 "L1-GND 21" (solid, pour order 194): 37.8,32 38.7,32 39,32.3 39,32.8 39.8,33.6 39.8,35.9 38.9,36.8 37.6,36.8 37.5,36.7 37.5,32.3
GND on L1 "L1-GND 22" (solid, pour order 196): 22.1,4.3 23.6,4.3 23.8,4.5 23.8,5.3 23.6,5.3 23.4,5.1 23,5.1 22.6,4.7 22.1,4.7
GND on L1 "L1-GND 23" (solid, pour order 236): 62.7,39.4 64.8,39.4 64.9,39.3 64.9,38.6 64.8,38.5 64.8,38.4 62.7,38.4 62.7,39.4
+VIN on L1 "L1-+VIN 3" (solid, pour order 160): 0.8,6.1 0.8,5.4 4.1,5.4 5.4,4.1 5.4,3.4 6.3,2.5 7.3,2.5 7.4,2.6 7.4,4.6 7.3,4.7 6.4,4.7 4.6,6.5 2.7,6.5 2.3,6.1
GND on L1 "L1-GND 24" (solid, pour order 238): 63.6,33.3 63.6,31.3 62.1,31.3 61.9,31.5 61.9,32.9 61.9,33.1 62.1,33.3 63.5,33.3 63.6,33.3
+VIN on L1 "L1-+VIN 4" (solid, pour order 237): 17 vertices, not listed, extent 61.3,33.5 69.2,37.1
PHASE1_2V5 on L1 "L1-PHASE1_2V5" (solid, pour order 240): 68.8,24.3 68.7,24.2 66.8,24.2 65.8,25.2 65.8,31.2 67.8,33.3 68.6,33.3 68.6,28.3 68.8,28.1
GND on L1 "L1-GND 25" (solid, pour order 243): 55.9,17.4 56,17.3 56.8,17.3 57,17.3 57.5,17.8 57.8,18.1 57.8,19.6 56.4,19.6 56.1,19.3 55.9,19.1 55.9,17.4
GND on L1 "L1-GND 26" (solid, pour order 244): 56.5,20.4 57.8,20.4 57.8,21.8 58.2,22.2 58.6,22.6 58.6,23 58.3,23.3 56.6,23.3 55.9,22.6 55.9,21
GND on L1 "L1-GND 27" (solid, pour order 245): 66.1,21.9 66.1,20.3 64.8,20.3 64.7,20.4 64.7,21.7 64.7,21.8 64.8,21.9 66.1,21.9
GND on L1 "L1-GND 28" (solid, pour order 246): 66.1,18.1 64.8,18.1 64.7,18.2 64.7,19.5 64.7,19.6 64.8,19.7 66.1,19.7 66.1,18.1
PHASE1_3V3 on L1 "L1-PHASE1_3V3" (solid, pour order 239): 1.2,15.7 1.3,15.8 3.2,15.8 4.2,14.8 4.2,8.8 2.2,6.7 1.4,6.7 1.4,11.7 1.2,11.9
GND on L1 "L1-GND 29" (solid, pour order 247): 69.2,8.7 69.2,6.7 67.7,6.7 67.5,6.9 67.5,8.5 67.7,8.7
GND on L1 "L1-GND 30" (solid, pour order 248): 62.7,0.6 64.8,0.6 64.9,0.7 64.9,1.5 64.8,1.6 62.7,1.6 62.7,0.6
+VIN on L1 "L1-+VIN 5" (solid, pour order 249): 62.4,6.1 63.9,6.1 64.5,5.5 64.5,3.8 64.1,3.4 61.9,3.4 61.3,4 61.3,4.3 62,5 62.3,5 62.4,5.1
PHASE2_1V5 on L1 "L1-PHASE2_1V5" (solid, remove dead copper, pour order 227): 18 vertices, not listed, extent 63,6.7 69.4,15.7
+1V375 on L1 "L1-+1V375 2" (solid, pour order 148): 3.3,24.7 3.3,21.2 3.4,21.1 10.9,21.1 10.9,22 8.2,24.7
+2V5 on L1 "L1-+2V5" (solid, pour order 241): 63.4,27.8 63.4,20.6 63.1,20.3 59.7,20.3 59.7,22.3 60.1,22.7 60.1,22.9 61.3,24.1 61.3,27.8
+3V3_ETH_AVDDH on L8 (PWR) "L8 (PWR)-+3V3_ETH_AVDDH" (solid, pour order 259): 15.4,39 19.9,39 19.9,33 20.3,33 20.3,30.7 18.6,30.7 18.6,31.6 16.4,31.6 14.6,29.8 12.5,29.8 12.5,34.4 15.4,37.3
+1V2_ETH_DVDDL on L8 (PWR) "L8 (PWR)-+1V2_ETH_DVDDL" (solid, pour order 258): 25 vertices, not listed, extent 1,29.8 15.2,39.4
+1V375 on L8 (PWR) "L8 (PWR)-+1V375" (solid, pour order 261): 21 vertices, not listed, extent 1,9.1 29.8,32.2
+1V375_VDDSOC_IN on L8 (PWR) "L8 (PWR)-+1V375_VDDSOC_IN" (solid, pour order 260): 18.6,30.5 18.6,29.4 17.3,28.1 17.3,26.5 16.7,25.9 16.7,22.1 26.4,22.1 27.1,21.4 29.8,21.4 29.8,22.9 28.8,23.9 28.8,25.4 29.9,26.5 29.9,30.5
+1V5_DDR on L8 (PWR) "L8 (PWR)-+1V5_DDR" (solid, pour order 262): 19 vertices, not listed, extent 1,1 69,39
+2V5 on L7 (PWR) "L7 (PWR)-+2V5" (solid, pour order 256): 37 vertices, not listed, extent 6.3,1 63.6,30.7
+2V5_VDDHIGH_VPH on L7 (PWR) "L7 (PWR)-+2V5_VDDHIGH_VPH" (solid, pour order 253): 23.5,16.3 23.5,18.2 22.2,18.2 21.7,18.7 17.3,18.7 15.9,17.3 14.8,17.3 14.8,15.5 16.3,15.5 16.8,16 18.1,17.3 20.5,17.3 21.5,16.3
+VIN on L7 (PWR) "L7 (PWR)-+VIN" (solid, pour order 257): 24 vertices, not listed, extent 1,1 69,39
+1V2_VDD_ARM_CAP on L7 (PWR) "L7 (PWR)-+1V2_VDD_ARM_CAP" (solid, pour order 254): 17.2,18.9 17.2,20.4 22.2,20.4 22.2,21.9 29.2,21.9 29.2,15.7 25.4,15.7 25.4,16.3 23.7,16.3 23.7,18.4 22.3,18.4 21.8,18.9
+SATA_VP on L7 (PWR) "L7 (PWR)-+SATA_VP" (solid, pour order 255): 22,20.6 17.2,20.6 16.7,21.1 16.7,24.6 18.2,24.6 18.2,25.3 22,25.3
+VDDUSB on L7 (PWR) "L7 (PWR)-+VDDUSB" (solid, pour order 252): 18.3,13.2 20.5,15.4 21,15.4 21,16.5 20.4,17.1 18.2,17.1 16.4,15.3 14.8,15.3 14.8,13.2
+PCIE_VPH on L7 (PWR) "L7 (PWR)-+PCIE_VPH" (solid, pour order 250): 21.8,13 20.4,11.6 20.4,8.9 17.9,8.9 17.9,13 18.4,13 20.6,15.2 21.6,15.2 21.8,15
+PCIE_VPTX on L7 (PWR) "L7 (PWR)-+PCIE_VPTX" (solid, pour order 251): 22,12.9 20.6,11.5 20.6,8.9 23.5,8.9 23.5,11 25.2,12.7 25.2,16.1 21.2,16.1 21.2,15.4 21.7,15.4 22,15.1
+2V5_ETH_DVDDH on L5 (PWR) "L5 (PWR)-+2V5_ETH_DVDDH" (solid, pour order 264): 21 vertices, not listed, extent 7.3,24 23.5,39.4
+5V_USB_VBUS on L5 (PWR) "L5 (PWR)-+5V_USB_VBUS" (solid, pour order 153): 21 vertices, not listed, extent 12.7,16.6 32.5,39
+1V2_ETH on L5 (PWR) "L5 (PWR)-+1V2_ETH" (solid, pour order 265): 17 vertices, not listed, extent 1,9.9 16.5,39
+DDR_VREF on L5 (PWR) "L5 (PWR)-+DDR_VREF" (solid, pour order 159): 62.1,29.4 65.8,29.4 65.8,32.2 65.3,32.7 61.6,32.7 61.6,29.9
+1V1_VDDSOC_CAP on L5 (PWR) "L5 (PWR)-+1V1_VDDSOC_CAP" (solid, pour order 156): 25 vertices, not listed, extent 15.5,7.3 48.2,39
+3V0_ALWAYS on L5 (PWR) "L5 (PWR)-+3V0_ALWAYS" (solid, pour order 263): 46 vertices, not listed, extent 1,1 69,26.6
+3V3 on L6 (PWR) "L6 (PWR)-+3V3" (solid, pour order 266): 1,39 1,1 69,1 69,39 1,39
GND on L2 "L2-GND" (solid, pour order 269): 0.1,0.1 0.1,39.9 69.9,39.9 69.9,0.1 0.1,0.1
GND on L11 "L11-GND" (solid, pour order 271): 0.1,39.9 0.1,0.1 69.9,0.1 69.9,39.9 0.1,39.9
GND on L4 (split plane): 69.898,0.102 0.102,0.102 0.102,39.898 69.898,39.898
GND on L9 (split plane): 69.898,0.102 0.102,0.102 0.102,39.898 69.898,39.898

## Other copper
L12:
  text "MM" at 4.9,27.2 h1
  text "(c) FEDEVEL 2013" at 54.45,19.85 h1.05

## Silkscreen, mask and mechanical layers (free items; w line width, h text height)
Top Overlay:
  text "FEDEVEL Academy" at 38.9,20.6 h1.15
  text "www.iMX6Rex.com" at 39.4,18 h1.15
Bottom Overlay:
  lines w0.2: 40.45,17 40.45,19 ; 43.2,17 43.2,19 ; 45.95,17 45.95,19 ; 48.7,17 48.7,19 ; 37.7,17 37.7,19 51.45,19 51.45,17 37.7,17
  text "J1" at 38.8,29.4 h1.15
  text "iMX6 Rex V1I1" at 53.25,21.75 h1.15
  text "E" at 39.45,17.5 h1.15
  text "D" at 42.2,17.5 h1.15
  text "C" at 44.95,17.5 h1.15
  text "B" at 47.7,17.5 h1.15
  text "A" at 50.45,17.5 h1.15
  text "MOD" at 55.3,17.4 h1.15
  text "J2" at 38.8,9.4 h1.15
Bottom Solder:
  text "(c) FEDEVEL 2013" at 54.45,19.85 h1.05
Mechanical Drawing:
  circle w0.6: c67.5,2.5 r1.1
  circle w0.6: c2.5,2.5 r1.1
  circle w0.6: c67.5,37.5 r1.1
  circle w0.6: c2.5,37.5 r1.1
  circle w0.2: c17.935,7.47 r0.5
  circle w0.2: c17.935,37.87 r0.5
  circle w0.2: c38.065,37.87 r0.525
  circle w0.2: c38.065,7.47 r0.5
  lines w0.6: 67.9,40 70,40 70,0 0,0 0,40 0.5,40 69.9,40
  text "Mechanical Drawing of iMX6 Rex Module" at 3.3,47.5 h1.52
  text ".VersionRevision" at 60.8,47.5 h1.52